# Altium PCB XY131B 65W-2C1A-V1.PcbDoc (part 2 of 2)
Units mm, origin at the board's own origin, x right, y up, seen from the top; angles counter-clockwise.
Board outline 28.2 x 43.45 mm, 4 copper layers (Top Layer, Signal Layer 1, Signal Layer 2, Bottom Layer), stack 0.778 mm thick; 73 components, 414 nets, 330 pads, 508 vias.
Unrouted connection lines stored in the file: 3.
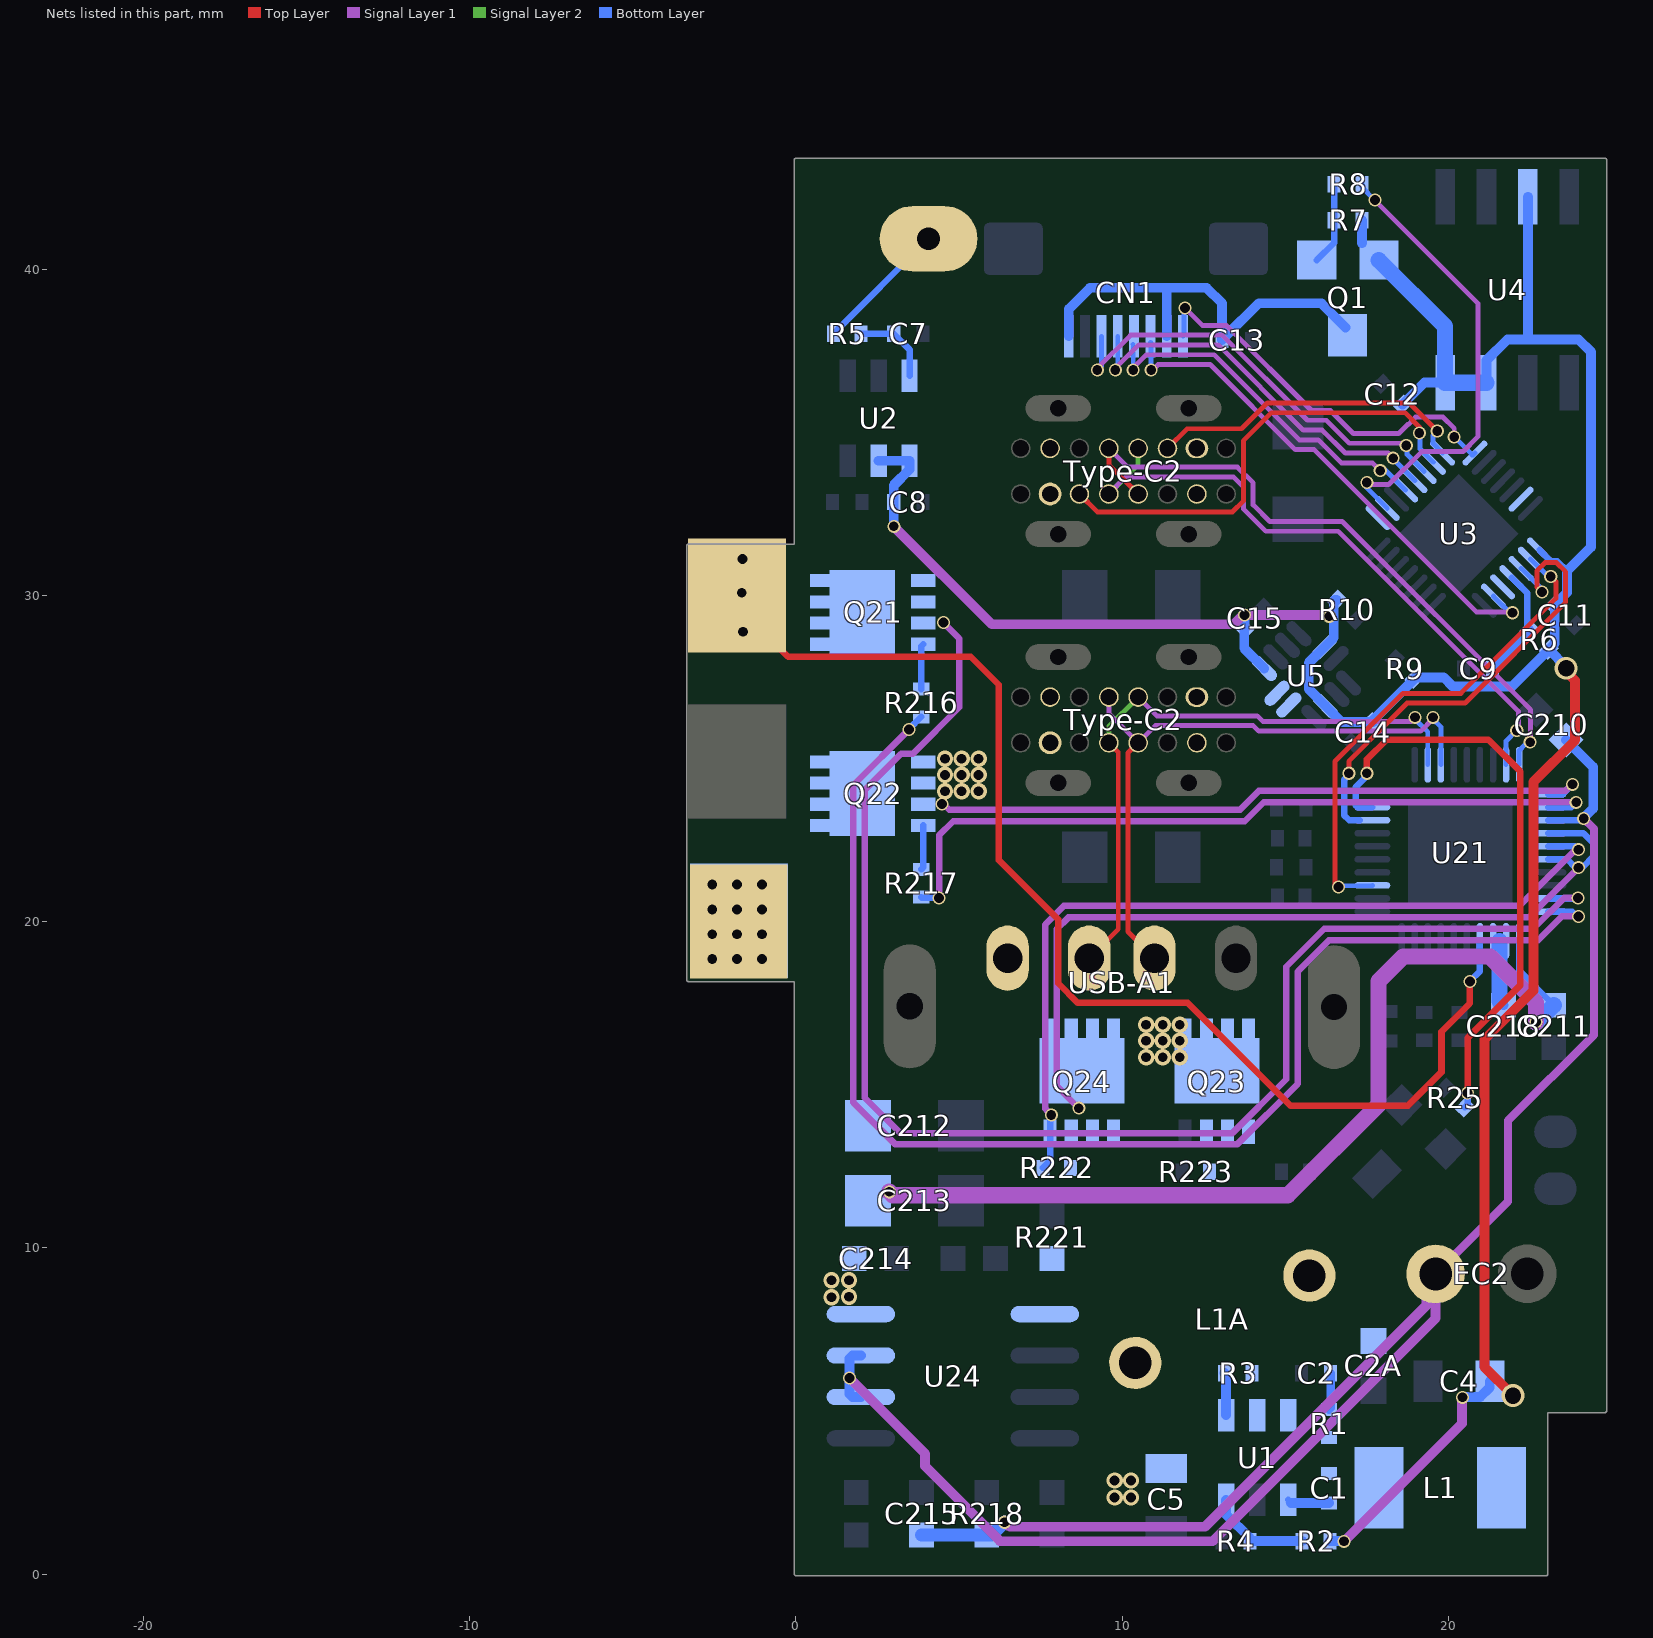
[diagram p4: the nets of this part, all layers, seen from the top]

## Via types
v1: diameter 0.5, hole 0.3, Top Layer to Bottom Layer, tented both sides, 434 vias
v2: diameter 0.4, hole 0.3, Top Layer to Bottom Layer, tented both sides, 72 vias
v3: diameter 0.7, hole 0.5, Top Layer to Bottom Layer, tented both sides, 2 vias

## Nets (pads, with @x,y where several pads share a name; then routed paths per layer and width w, separated by ;. In a path a pad name is that pad's centre, name@x,y a point inside that pad or via, vN(x,y) a via of type N, cw(c..) or ccw(c..) an arc to the next point about the centre after c; other vN are vias at no path point) (continued)
IC-DM_C1: Type-C2.A7DM1@10.492,34.51 Type-C2.B7DM1@9.592,33.11 U21.29 | length 19.7
  Signal Layer 1 w0.15: Type-C2.B7DM1@9.592,33.11 10.117,33.635 13.409,33.635 13.717,33.327 13.717,32.653 14.402,31.968 16.622,31.968 22.145,26.445 22.145,25.912 v2(22.096,25.864)
  Signal Layer 2 w0.15: Type-C2.B7DM1@9.592,33.11 10.492,34.01 Type-C2.A7DM1@10.492,34.51
  Bottom Layer w0.15: U21.29@21.77,24.81 21.77,25.537 v2(22.096,25.864)
IC-DM_C2: Type-C2.A7DM1@10.492,26.885 Type-C2.B7DM1@9.592,25.485 U21.23 USB-A1.2 | length 19.3
  Top Layer w0.15: USB-A1.2@8.992,18.881 9.88,19.77 9.88,25.197 Type-C2.B7DM1@9.592,25.485
  Signal Layer 1 w0.15: Type-C2.A7DM1@10.492,26.885 11.067,26.31 14.14,26.31 14.311,26.14 18.851,26.14 v2(18.976,26.265)
  Signal Layer 2 w0.15: Type-C2.B7DM1@9.592,25.485 9.592,25.985 Type-C2.A7DM1@10.492,26.885
  Bottom Layer w0.15: v2(18.976,26.265) 18.976,26.214 19.37,25.82 U21.23@19.37,24.81
IC-DP_C1: Type-C2.A6DP1@9.592,34.51 Type-C2.B6DP1@10.492,33.11 U21.30 | length 20.1
  Top Layer w0.15: Type-C2.A6DP1@9.592,34.51 9.592,34.01 Type-C2.B6DP1@10.492,33.11
  Signal Layer 1 w0.15: Type-C2.A6DP1@9.592,34.51 10.167,33.935 13.534,33.935 14.017,33.452 14.017,32.777 14.526,32.268 16.746,32.268 22.521,26.493 22.521,25.512 v2(22.51,25.501)
  Bottom Layer w0.15: U21.30@22.17,24.81 22.17,25.246 v2@22.377,25.453
IC-DP_C2: Type-C2.A6DP1@9.592,26.885 Type-C2.B6DP1@10.492,25.485 U21.24 USB-A1.3 | length 19.9
  Top Layer w0.15: Type-C2.B6DP1@10.492,25.485 10.18,25.173 10.18,19.693 USB-A1.3@10.992,18.881
  Signal Layer 1 w0.15: Type-C2.A6DP1@9.592,26.885 9.592,26.385 Type-C2.B6DP1@10.492,25.485 11.017,26.01 14.016,26.01 14.186,25.84 19.152,25.84 19.526,26.214 v2@19.526,26.248
  Bottom Layer w0.15: v2(19.526,26.265) 19.526,26.214 19.77,25.97 U21.24@19.77,24.81
"IIC SCL": U3.3 U21.18 | length 14.7
  Top Layer w0.15: v2(16.95,24.55) 16.95,24.916 18.734,26.7 20.51,26.7 23.597,29.787 23.597,30.727 23.316,31.007 22.964,31.007 22.715,30.758 22.715,30.259 v2(22.872,30.102)
  Bottom Layer w0.15: U3.3@22.229,30.829 22.824,30.235 22.824,30.15 v2(22.872,30.102)
  Bottom Layer w0.2: v2(16.95,24.55) 16.95,24.496 16.805,24.351 16.805,23.265 16.96,23.11 U21.18@17.28,23.11
"IIC SDA": U3.2 U21.13 | length 15.4
  Top Layer w0.15: v2(16.63,21.06) 16.525,21.165 16.525,24.915 18.61,27 20.386,27 23.297,29.911 23.297,30.426 v2(23.14,30.582)
  Bottom Layer w0.15: v2(16.63,21.06) 16.67,21.1 17.66,21.1 U21.13@17.67,21.11 ; U3.2@22.512,31.112 22.526,31.112 23.008,30.63 23.092,30.63 v2(23.14,30.582)
INT1: U5.5
INT2: U5.6
KEY: 
LCD_3V3: 
LCD_BL: 
LCD_CLK: CN1.6 U3.6 | length 16
  Signal Layer 1 w0.15: v2(10.89,36.91) 10.933,36.91 11.103,37.08 12.699,37.08 15.31,34.47 15.887,34.47 20.859,29.499 21.941,29.499 v2(21.97,29.47)
  Bottom Layer w0.15: CN1.6@10.87,37.76 10.89,37.74 v2(10.89,36.91) ; U3.6@21.381,29.981 21.892,29.47 v2(21.97,29.47)
LCD_CS: CN1.8 U3.25 | length 12.2
  Signal Layer 1 w0.15: v2(11.93,38.81) 12.46,38.28 13.196,38.28 15.806,35.669 16.384,35.669 17.088,34.965 18.474,34.965 18.748,35.239 18.771,35.239 18.997,35.465 19.836,35.465 20.18,35.121 v2(20.18,34.86)
  Bottom Layer w0.15: CN1.8@11.867,37.946 11.898,37.978 11.898,38.778 v2(11.93,38.81) ; v2(20.18,34.86) 20.729,34.311 20.761,34.311 U3.25@20.815,34.365
LCD_DC: CN1.4 U3.21 | length 12.3
  Signal Layer 1 w0.15: v2(9.79,36.91) 9.79,36.961 10.509,37.68 12.948,37.68 15.558,35.07 16.136,35.07 16.84,34.365 18.151,34.365 v2(18.309,34.207)
  Bottom Layer w0.15: v2(9.79,36.91) 9.867,36.987 CN1.4@9.867,37.946 ; v2(18.309,34.207) 18.309,34.184 U3.21@18.976,33.516
LCD_EN: 
LCD_EN2: R8.1 U3.18 | length 14.3
  Signal Layer 1 w0.15: v2(17.5,33.46) 17.559,33.401 18.171,33.401 19.18,34.41 20.45,34.41 20.904,34.864 20.904,38.959 17.75,42.113 v2(17.75,42.12)
  Bottom Layer w0.15: R8.1@17.35,42.61 17.35,42.52 v2(17.75,42.12) ; v2(17.5,33.46) 17.5,33.296 U3.18@18.128,32.668
LCD_MOSI: CN1.5 U3.20 | length 11.1
  Signal Layer 1 w0.15: v2(10.34,36.91) 10.34,36.978 10.45,37.088 10.45,37.09 10.74,37.38 12.824,37.38 15.434,34.77 16.011,34.77 16.716,34.066 17.673,34.066 v2(17.913,33.826)
  Bottom Layer w0.15: CN1.5@10.33,37.7 10.34,37.69 v2(10.34,36.91) ; v2(17.913,33.826) 18.09,33.826 18.682,33.234 U3.20@18.694,33.234
LCD_RES: CN1.3 U3.22 | length 13.5
  Signal Layer 1 w0.15: v2@9.24,36.92 9.24,36.961 10.259,37.98 13.072,37.98 15.682,35.37 16.26,35.37 16.964,34.665 18.645,34.665 v2(18.71,34.6)
  Bottom Layer w0.15: v2(9.24,36.91) 9.365,37.035 9.365,37.946 CN1.3@9.367,37.946 ; v2(18.71,34.6) 18.734,34.576 18.734,34.324 U3.22@19.259,33.799
LCD_RST: 
LCD_TE: U3.17
LDO3V3: 
LEDA: 
LGATE: 
LGATE1: 
LINK: 
MCU1_VCC: 
ME: 
MISO: 
MOSI: 
MP: 
MP1: 
N: 
NetBD1_1: 
NetBD1_2: 
NetBD1_3: 
NetBD2_2: 
NetC1_1: 
NetC1_2: 
NetC2_1: C1.1 L1.1 R1.2 U1.6
NetC2_2: C1.2 U1.1 | length 1.3
  Bottom Layer w0.2: U1.1@15.088,2.273 U1.1@15.181,2.181
  Bottom Layer w0.3: U1.1@15.181,2.181 C1.2@16.344,2.181
NetC3_1: 
NetC3_2: 
NetC4/NC_1: 
NetC4_1: 
NetC4_2: C2.2 R1.1 | length 1.1
  Bottom Layer w0.254: R1.1@16.344,5.041 16.394,5.091 C2.2@16.394,6.161
NetC5_1: 
NetC5_2: 
NetC6_1: 
NetC6_2: 
NetC7_1: 
NetC7_2: 
NetC8_1: 
NetC8_2: 
NetC9_1: 
NetC9_2: 
NetC10_1: 
NetC10_2: 
NetC11_1: 
NetC12_1: 
NetC13_1: 
NetC13_2: C7.2 R5.1 U2.3 | length 2.5
  Bottom Layer w0.2: R5.1@1.999,38.024 C7.2@2.999,38.024 3.485,37.538 U2.3@3.485,36.732
NetC14_1: 
NetC14_2: 
NetC18_2: 
NetC20_2: C218.2 U21.2 U21.3 | length 2
  Bottom Layer w0.3: C218.2@21.57,17.56 C218.2@21.69,17.44
  Bottom Layer w0.5: C218.2@21.57,17.56 21.57,19.41
NetC21_1: 
NetC21_2: 
NetC22_1: 
NetC22_2: 
NetC28_1: 
NetC31_1: 
NetC36_1: 
NetC36_2: 
NetC37_1: 
NetC41_1: 
NetC41_2: 
NetC48_1: 
NetC53_1: 
NetC53_2: 
NetC56_1: 
NetCC2_1: 
NetCN2_4: 
NetCN2_10: 
NetCX1_1: 
NetCX1_2: 
NetD1_2: 
NetD2_2: 
NetD3_1: 
NetD3_2: 
NetD18_2: 
NetD+_1: 
NetD-_1: 
NetF1_1: 
NetF1_2: 
NetIC1_23: 
NetIC1_27: 
NetIC2_3: 
NetIC2_5: 
NetIC2_6: 
NetJ1_A5: 
NetJ1_A6: 
NetJ1_A7: 
NetJ1_B5: 
NetJ2_A5: 
NetJ2_A6: 
NetJ2_A7: 
NetJ2_B5: 
NetJ3_2: 
NetJ3_3: 
NetK?_1: 
NetLF1_1: 
NetNTC1_1: 
NetQ1_4: 
NetQ1_G: 
NetQ2_1: 
NetQ2_2: 
NetQ2_3: 
NetQ3_B: 
NetQ3_C: 
NetQ3_G: 
NetQ4_G: 
NetQ5_G: 
NetQ6_D: 
NetQ6_G: Q1.G R7.1 R8.2 | length 2.6
  Bottom Layer w0.2: Q1.G@15.965,40.28 16.5,40.815 R7.1@16.5,41.5 R8.2@16.5,42.61
NetQ7_S: 
NetQ8_1: 
NetQ8_3: 
NetQ8_D: 
NetQ8_G: 
NetR1_1: 
NetR1_2: 
NetR2_2: 
NetR3_2: 
NetR5_2: 
NetR6_1: 
NetR7_1: R2.1 R4.2 U1.3 | length 3.2
  Bottom Layer w0.3: U1.3@13.188,2.273 13.188,1.832 13.914,1.106 R4.2@13.914,1.011 R2.1@15.519,1.011
NetR8_1: R3.1 U1.4 | length 1.3
  Bottom Layer w0.3: R3.1@13.134,6.161 13.188,6.107 U1.4@13.188,4.873
NetR9_2: 
NetR10_1: 
NetR10_2: 
NetR11_1: 
NetR11_2: pad.18 R5.2 | length 4.1
  Bottom Layer w0.2: R5.2@1.149,38.024 4.06,40.935 pad.18@4.067,40.935
NetR12_2: 
NetR13_1: 
NetR13_2: 
NetR14_2: 
NetR16_2: 
NetR18_2: 
NetR20_1: 
NetR21_2: 
NetR22_1: 
NetR22_2: 
NetR23_1: 
NetR24_1: 
NetR24_2: 
NetR25_1: 
NetR25_2: 
NetR26_2: 
NetR31_1: 
NetR32_1: 
NetR46_1: 
NetR46_2: 
NetR47_1: 
NetR47_2: 
NetR54_1: 
NetR55_2: 
NetRT1_2: 
NetTYPE_C1_A1: 
NetTYPE_C1_A4: 
NetTYPE_C1_CC1: 
NetTYPE_C1_DM1: 
NetTYPE_C1_DP1: 
NetTYPE_C2_A4: 
NetTYPE_C2_CC1: 
NetTYPE_C2_DM1: 
NetTYPE_C2_DP1: 
NetUSBA1_2: 
NetUSBA1_3: 
NetUSBA1_4: 
NetXC6_1: 
NetXC7_1: 
NetXC7_2: 
NetXC8_1: 
NetXC9_1: 
NetXC9_2: 
NetXC12_1: 
NetXC12_2: pad.17 U21.4 | length 37.5
  Top Layer w0.2: pad.17@-1.809,30.004 -1.809,29.689 -0.24,28.12 5.36,28.12 6.22,27.26 6.22,21.89 8.04,20.07 8.04,18.11 8.64,17.51 12.01,17.51 15.17,14.35 18.75,14.35 19.79,15.39 19.79,16.626 20.66,17.496 v2(20.66,18.17)
  Bottom Layer w0.2: v2(20.66,18.17) 20.97,18.48 U21.4@20.97,19.41
  other v1: -1.62,28.89 -1.66,30.08 -1.64,31.12
NetXC13_1: 
NetXC14_1: 
NetXC15_1: 
NetXC16_1: 
NetXC17_1: 
NetXC21_2: 
NetXC25_1: 
NetXD?_1: 
NetXQ1_1: 
NetXQ1_2: 
NetXQ2_1: 
NetXQ2_2: 
NetXQ3_1: 
NetXQ6_D: 
NetXQ6_G: 
NetXR1_1: 
NetXR2_1: 
NetXR8_2: 
NetXR9_2: 
NetXR10_2: 
NetXR14_2: 
NetXR15_1: 
NetXR18_2: 
NetXR19_2: 
NetXR23_1: 
NetXR24_1: 
NetXU2_6: 
NewNet01: 
NewNet03: 
NewNet04: 
NewNet05: 
NRST: 
NTC: 
NTC1: 
NTC2: 
ntcc: 
OLED_CS: 
OLED_D/CX: 
OLED_RST: 
OLED_SCL: 
OLED_SDA: 
OPTO: 
OPTO1: 
PA3: 
PB7: U3.30
PB8: 
PDER: 
PF3: U3.5
PF4: 
PGND: 
PLUGA: 
RA: 
RS: 
RST: C9.1 R6.1 U3.4 | length 3.5
  Bottom Layer w0.2: U3.4@21.946,30.546 22.423,30.07 22.423,28.997 R6.1@22.479,28.941
  Bottom Layer w0.3: C9.1@21.36,27.76 22.479,28.879 R6.1@22.479,28.941
RX: 
RX1: 
RX2: 
SCK: 
SCL: 
"SCL 1": 
SDA: 
"SDA 1": 
SEN1_P: 
SEN2_P: 
SEN21_P: 
SEN22_P: 
SGND: 
SRCG_A: Q24.G R222.1 U21.35 | length 25.9
  Signal Layer 1 w0.2: 7.64,19.04 7.64,19.91 8.211,20.481 22.175,20.481 23.899,22.206 v2(23.986,22.206) ; 7.64,19.04 cw(c6.492,18.981) 7.642,18.981 7.642,18.781 cw(c6.492,18.781) 7.64,18.722 7.64,14.266 7.699,14.208 v2(7.83,14.076)
  Bottom Layer w0.2: R222.1@7.57,12.45 7.79,12.67 Q24.G@7.79,13.56 7.79,14.036 v2(7.83,14.076) ; U21.35@23.07,22.31 23.882,22.31 v2(23.986,22.206)
SRCG_C1: Q21.G R216.1 R216.2 U21.40 | length 42.5
  Signal Layer 1 w0.2: v2(3.47,25.89) 1.76,24.18 1.76,14.46 3.05,13.17 13.525,13.17 15.38,15.025 15.38,18.47 16.341,19.431 22.751,19.431 23.48,20.16 v2(23.986,20.16)
  Bottom Layer w0.2: v2(3.47,25.89) 3.47,25.91 R216.2@3.84,26.28 ; R216.1@3.84,27.13 3.84,28.442 Q21.G@3.903,28.505 ; U21.40@23.07,20.31 23.804,20.31
SRCG_C2: Q22.G R217.1 R217.2 U21.32 | length 24.7
  Signal Layer 1 w0.2: v2(4.39,20.73) 4.39,22.65 4.82,23.08 13.76,23.08 14.34,23.66 v2(23.92,23.66)
  Bottom Layer w0.2: R217.2@3.84,20.75 3.86,20.73 v2(4.39,20.73) ; R217.1@3.84,21.6 3.903,21.663 Q22.G@3.903,22.95 ; U21.32@23.07,23.51 23.77,23.51 v2(23.92,23.66)
SW: L1A.1 R221.1 U24.5SW
SW1: 
SW2: 
SWCLK: Type-C2.A8SUB1@11.392,34.51 U3.24 | length 10.1
  Top Layer w0.15: Type-C2.A8SUB1@11.392,34.51 11.992,35.11 13.66,35.11 14.45,35.9 18.8,35.9 v2(19.66,35.04) v2@19.66,34.972
  Bottom Layer w0.15: v2(19.66,35.04) 19.53,34.91 19.53,34.66 U3.24@19.825,34.365
SWD: Type-C2.B8SUB2@8.692,33.11 U3.23 | length 14.4
  Top Layer w0.15: Type-C2.B8SUB2@8.692,33.11 9.242,32.56 13.384,32.56 13.717,32.893 13.717,34.743 14.574,35.6 18.676,35.6 19.11,35.166 v2(19.11,34.977)
  Bottom Layer w0.15: v2(19.11,34.977) 19.135,34.952 19.135,34.489 U3.23@19.542,34.082
SWDIO: 
SWIO: 
TA: 
TX: 
Ut_RXD2: 
Ut_TXD2: 
VBUS1: 
VBUS1-1: 
VBUS2: 
VBUS3: 
VBUS3-1: 
VBUS4: 
VBUS4-1: 
VBUS_A3: C2A.2 C210.2 C215.1 EC2.1 L1A.2 Q23.S Q24.S R218.1 R222.2 R223.2 U21.33 U24.2CSP U24.3CSN | length 66
  Signal Layer 1 w0.25: EC2.1@19.61,9.2 21.83,11.42 21.83,13.9 24.461,16.531 24.461,22.848 v2(24.149,23.16)
  Signal Layer 1 w0.3: v2(1.64,6.01) 3.96,3.69 3.96,3.31 6.26,1.01 12.78,1.01 19.61,7.84 EC2.1@19.61,9.2 19.323,8.913 19.323,8.233 12.542,1.452 6.555,1.452 6.417,1.59 v2(6.39,1.59)
  Bottom Layer w0.2: U21.33@23.07,23.11 24.045,23.11 24.095,23.16 v2(24.149,23.16)
  Bottom Layer w0.3: U24.2CSP@1.992,5.43 1.732,5.43 1.64,5.522 1.64,6.608 1.732,6.7 U24.3CSN@1.992,6.7 ; C210.2@23.61,25.57 24.44,24.74 24.44,23.473 24.149,23.182 v2(24.149,23.16)
  Bottom Layer w0.4: C215.1@3.85,1.2 R218.1@5.85,1.2 6,1.2 v2(6.39,1.59)
VBUS_C1: C5.1 C211.1 C212.1 C213.1 C214.2 pad.16@-1.745,20.027 pad.16@-1.752,20.002 Q21.D Q22.D R3.2 U1.5 U21.1 U24.4Vin | length 29.5
  Signal Layer 1 w0.5: v2(2.862,11.719) 2.971,11.61 15.08,11.61 17.86,14.39 17.86,18.17 18.621,18.931 21.279,18.931 22.69,17.52 v2(22.69,16.921)
  Bottom Layer w0.2: U21.1@22.17,19.41 22.17,18.5 C211.1@23.23,17.44
  Bottom Layer w0.5: v2(22.69,16.921) 22.711,16.921 C211.1@23.23,17.44
  other v1: 9.77,2.35 10.27,2.35 9.77,2.87 10.27,2.87 1.09,8.49 1.63,8.5 1.09,9.01 1.63,9.01 -2.566,18.852 -1.804,18.852 -1.042,18.852 -2.566,19.614 -1.804,19.614 -1.042,19.614 -2.566,20.376 -1.804,20.376 -1.042,20.376 -2.566,21.138 -1.804,21.138 -1.042,21.138
VBUSA: 
VBUSA1: 
VBUSC: 
VBUSC1: 
VBUSC2: 
VBUSC_A: Q24.D U21.34 U21.36 USB-A1.1 | length 26.2
  Signal Layer 1 w0.2: v2(8.673,14.283) 7.99,14.967 7.99,18.59 7.992,18.592 7.992,19.767 8.356,20.131 14.96,20.131 22.461,20.131 v2(23.986,21.656)
  Bottom Layer w0.2: U21.36@23.07,21.91 23.645,21.91 23.899,21.656 v2(23.986,21.656) 24.104,21.656 24.46,22.012 24.46,22.39 24.14,22.71 U21.34@23.07,22.71 ; v2@23.97,21.72 23.996,21.694 v2@24.06,21.694
VBUSC_C1: Q21.S Type-C2.A4@7.792,34.51 Type-C2.A9@12.292,34.51 Type-C2.B4@12.292,33.11 Type-C2.B9@7.792,33.11 U21.39 | length 44.4
  Signal Layer 1 w0.2: v2(4.52,29.17) 5.01,28.68 5.01,26.57 3.588,25.148 3.222,25.148 2.11,24.035 2.11,14.605 3.195,13.52 13.38,13.52 15.03,15.17 15.03,18.615 16.196,19.781 22.606,19.781 23.551,20.726 v2(23.976,20.726)
  Bottom Layer w0.2: U21.39@23.07,20.71 23.96,20.71 v2(23.976,20.726)
VBUSC_C2: Q22.S Q23.D Type-C2.A4@7.792,26.885 Type-C2.A9@12.292,26.885 Type-C2.B4@12.292,25.485 Type-C2.B9@7.792,25.485 U21.31 | length 20.6
  Signal Layer 1 w0.2: v2(4.48,23.61) 4.517,23.61 4.697,23.43 13.615,23.43 14.195,24.01 23.593,24.01 23.793,24.21 v2(23.81,24.21)
  Bottom Layer w0.2: U21.31@23.07,23.91 23.51,23.91 v2(23.81,24.21)
  other v1: 10.735,15.847 11.245,15.847 11.765,15.847 10.735,16.347 11.245,16.347 11.765,16.347 10.735,16.841 11.245,16.841 11.765,16.841 4.57,24 5.08,24 5.6,24 4.57,24.5 5.08,24.5 5.6,24.5 4.57,24.994 5.08,24.994 5.6,24.994
VC2-ON: R25.2 U21.19 | length 18.5
  Top Layer w0.2: v2(17.5,24.55) 17.5,24.971 18.109,25.58 21.23,25.58 22.21,24.6 22.21,18.056 20.59,16.436 v2(20.59,14.75)
  Bottom Layer w0.2: v2(17.5,24.55) 17.5,24.464 17.155,24.119 17.155,23.575 17.22,23.51 U21.19@17.67,23.51 ; R25.2@20.501,14.304 20.59,14.393 v2(20.59,14.75)
VCC: 
VCC1: 
VCC2: 
VDD: C13.2 CN1.1 CN1.7 Q1.D | length 13.2
  Bottom Layer w0.3: CN1.1@8.367,37.946 8.367,38.787 9.01,39.43 11.41,39.43 ; CN1.7@11.367,37.946 11.367,39.387 11.41,39.43 ; Q1.D@16.85,38.21 16.11,38.95 16.11,38.96 14.19,38.96 13.16,37.93 13.11,37.93 13.06,37.88 C13.2@13.06,37.83 13.06,38.96 12.59,39.43 11.41,39.43
VDD1: 
VDRV: 
VDRV1: 
VIN: 
VIN_3V: C4.2 C8.1 C11.1 C12.2 C14.2 C15.1 L1.2 Q1.S R2.2 R6.2 R7.2 R9.2 R10.1 U2.4 U2.5 U3.1 U4.3 U4.7 U4.8 U5.3 U5.7 U5.11 | length 91.9
  Top Layer w0.3: v3(21.98,5.47) 21.11,6.34 21.11,16.39 22.61,17.89 22.61,24.29 23.88,25.56 23.88,27.394 23.61,27.664 v3(23.61,27.77)
  Signal Layer 1 w0.3: v2(3,32.12) 6,29.12 13.43,29.12 13.71,29.4 v2(13.75,29.4) 16.31,29.4 v2(16.35,29.36) ; v2(16.805,1.004) 20.421,4.62 20.421,5.411 v2(20.43,5.42)
  Bottom Layer w0.2: U3.1@22.795,31.395 23.14,31.05 23.34,31.05 23.64,30.75
  Bottom Layer w0.3: U2.5@2.535,34.132 U2.4@3.485,34.132 3.485,33.865 2.999,33.379 C8.1@2.999,32.864 v2(3,32.12) v2(3,32.12) ; C15.1@13.742,28.982 13.742,28.381 U5.7@14.359,27.764 ; v2(13.75,29.4) 13.75,28.97 C15.1@13.76,28.96 ; R2.2@16.369,1.011 16.798,1.011 v2(16.805,1.004) ; R10.1@16.519,29.861 R10.1@16.579,29.861 16.49,29.772 16.49,28.707 U5.11@16.204,28.422 15.72,27.937 15.72,27.128 16.231,26.617 U5.3@16.231,26.61 16.723,26.118 C14.2@17.698,26.118 17.698,26.178 18.894,27.374 18.894,27.384 18.995,27.485 19.86,27.485 20.136,27.21 21.95,27.21 R6.2@23.08,28.34 ; Q1.S@17.35,40.8 R7.2@17.35,41.5 ; C12.2@18.598,35.852 19.271,36.525 U4.8@19.9,36.525 ; v2(20.43,5.42) 20.435,5.425 20.976,5.425 21.27,5.72 C4.2@21.27,5.91 ; U4.7@21.17,36.525 21.17,37.21 21.81,37.85 22.43,37.85 ; U4.3@22.44,42.225 22.44,37.86 22.43,37.85 ; v3@23.502,27.77 v3(23.61,27.77) 23.61,27.81 R6.2@23.08,28.34 ; 22.43,37.85 23.99,37.85 24.37,37.47 24.37,31.48 23.64,30.75 23.64,30.093 C11.1@23.264,29.716 23.264,28.524 R6.2@23.08,28.34
  Bottom Layer w0.5: Q1.S@17.87,40.28 19.9,38.25 U4.8@19.9,36.525 U4.7@21.17,36.525
VMCU: 
VOUT1: 
VOUT1G: 
VOUT2: 
VOUT2G: 
VOUT3G: 
VOUTA: 
WP: 
pads on no net: Type-C2.A8SUB1@11.392,26.885 Type-C2.B8SUB2@8.692,25.485 U3.8 U3.9 U3.32 U5.10 U21.5 U21.6 U21.20 U21.21 U21.37 U21.38 U24.6SW

## Polygon pours and split planes (outlines as drawn)
FLASH_MOSI on Bottom Layer "FLASH_MOSI_L04_P033" (solid, remove dead copper, pour order 33): 22.99,37.9 22.99,34.54 22.85,34.4 24.12,34.4 24.12,37.87 24.08,37.91
FLASH_CLK on Bottom Layer "FLASH_CLK_L04_P032" (solid, remove dead copper, pour order 32): 23.03,37.91 23.03,35.05 21.37,33.39 20.79,33.39 21.12,33.72 21.12,38
"IIC SDA" on Bottom Layer "IIC_SDA_L04_P030" (solid, remove dead copper, pour order 30): 15.7,21.99 15.7,20.25 15.33,19.88 15.61,19.6 18.13,19.6 18.13,21.4 18.29,21.56
NetXC12_2 on Bottom Layer "NETXC12_2_L04_P029" (solid, remove dead copper, pour order 29): 19.74,20.48 19.79,20.43 19.79,16.61 21.65,16.61 21.67,16.59 21.67,19.78
VBUS_C1 on Bottom Layer "VBUS_C1_L04_P028" (solid, remove dead copper, pour order 28): 21.58,20.28 21.58,16.97 22.1,16.45 23.67,16.45 23.67,20.03 23.72,20.08
CSP_A on Bottom Layer "CSP_A_L04_P011" (solid, remove dead copper, pour order 11): 11.02,22.82 10.92,22.72 10.92,18.41 11.44,17.89 15.48,17.89 15.56,17.81 15.56,15.97 16.13,15.4 16.86,15.4 17.3,15.84 17.3,18.88 15.94,20.24 13.64,20.24 12.43,21.45 12.43,22.82
GND on Bottom Layer "GND_L04_P026" (solid, remove dead copper, pour order 26): -7.88,49.89 -7.88,-0.37 -5.38,-2.87 -5.3,-2.79 31.36,-2.79 31.36,44.57 29.25,46.68
VBUSC_C2 on Bottom Layer "VBUSC_C2_L04_P019" (solid, remove dead copper, pour order 19): 10.55,17.11 14.08,17.11 14.24,16.95 14.24,14 14.17,13.93 10.22,13.93 10.11,14.04 10.11,17.03 10.16,17.08 10.58,17.08
CSP_C1 on Bottom Layer "CSP_C1_L04_P017" (solid, remove dead copper, pour order 17): 6.47,36.43 6.47,31.77 6.83,31.41 16.11,31.41 16.28,31.58 16.28,33.04 16.22,33.1 14.36,33.1 14.19,33.27 14.19,35.96 13.81,36.34 6.87,36.34 6.46,35.93
CSP_C2 on Bottom Layer "CSP_C2_L04_P016" (solid, remove dead copper, pour order 16): 9.57,31.06 9.57,29.26 9.89,28.94 12.58,28.94 13.74,27.78 13.74,24.52 12.86,23.64 6.99,23.64 3.99,26.64 3.99,28.64 5.957,30.607
VBUSC_C1 on Bottom Layer "VBUSC_C1_L04_P013" (solid, remove dead copper, pour order 13): 3.52,32.67 6.17,35.32 12.4,35.32 12.69,35.03 12.69,31.06 12.57,30.94 8.12,30.94 6.14,28.96 3.52,28.96
VBUSC_C2 on Bottom Layer "VBUSC_C2_L04_P012" (solid, remove dead copper, pour order 12): 3.49,27.84 12.29,27.84 12.77,27.36 12.77,24.94 12.75,24.94 11.2,23.39 6.1,23.39 3.49,23.39
VBUSC_A on Bottom Layer "VBUSC_A_L04_P010" (solid, remove dead copper, pour order 10): 6.08,20 5.57,19.49 5.57,16.27 7.82,14.02 10.14,14.02 10.14,16.94 10.04,17.04 7.93,17.04 7.49,17.48 7.49,19.32 6.81,20 6.68,20
VBUS_A3 on Bottom Layer "VBUS_A3_L04_P009" (solid, remove dead copper, pour order 9): 19.57,9.24 18.15,7.82 15.87,7.82 14.92,8.77 14.92,9.52 15.35,9.95 18.77,9.95 19.51,9.21
VBUS_A3 on Bottom Layer "VBUS_A3_L04_P008" (solid, remove dead copper, pour order 8): 8.22,13.92 18.1,13.92 20.64,11.38 20.64,8.64 18.69,6.69 17.31,6.69 17.23,6.77 17.23,7.54 17.33,7.64 18.26,7.64 19.2,8.58 19.2,9.87 18.83,10.24 10.13,10.24 8.18,12.19 8.18,13.95 8.22,13.99
VIN_3V on Bottom Layer "VIN_3V_L04_P006" (solid, remove dead copper, pour order 6): 20.84,6.54 20.84,1.37 20.9,1.31 22.33,1.31 22.4,1.38 22.4,5.96 21.76,6.6 20.89,6.6 20.83,6.54
NetC2_1 on Bottom Layer "NETC2_1_L04_P005" (solid, remove dead copper, pour order 5): 14.83,1.61 15.05,1.39 18.65,1.39 18.65,4.38 18.59,4.44 16.04,4.44 15.56,4.92 15.56,5.34 15.51,5.39 14.86,5.39 14.83,5.36
VBUS_C1 on Bottom Layer "VBUS_C1_L04_P004" (solid, remove dead copper, pour order 4): 9.49,2.23 9.49,3.04 10.65,4.2 13.6,4.2 13.77,4.37 13.77,6.38 13.8,6.41 14.23,6.41 14.42,6.22 14.42,3.9 14.09,3.57 12.09,3.57 11.99,3.47 11.99,2.77 11.98,2.76 11.08,2.76 10.39,2.07 9.65,2.07
SW on Bottom Layer "SW_L04_P001" (solid, remove dead copper, pour order 1): 7.46,10.08 7.46,9.01 6.55,8.1 6.55,7.49 6.71,7.33 8.88,7.33 9.37,6.84 9.37,6.23 9.96,5.64 10.82,5.64 11.27,6.09 11.27,7.11 8.3,10.08 8.23,10.08
VBUS_C1 on Bottom Layer "VBUS_C1_L04_P000" (solid, remove dead copper, pour order 0): 3.17,7.79 3.06,7.68 0.64,7.68 0.13,8.19 0.13,16.69 -1.09,17.91 -3.54,17.91 -3.54,22.45 -3.71,22.62 0.24,22.62 0.41,22.79 0.41,30.69 0.56,30.84 0.58,30.82 3.17,30.82
GND on Signal Layer 1 "GND_L02_P024" (solid, remove dead copper, pour order 24): -2.1,51.04 -5.85,47.29 -5.85,-2.97 -3.58,-5.24 -2.45,-4.11 31.79,-4.11 31.79,48.08 32.31,48.6
CSP_C1 on Signal Layer 1 "CSP_C1_L02_P022" (solid, remove dead copper, pour order 22): 7,36.36 6.51,35.87 6.51,32.05 7.08,31.48 12.95,31.48 13.58,32.11 13.58,35.49 12.71,36.36 12.56,36.36
CSP_C2 on Signal Layer 1 "CSP_C2_L02_P021" (solid, remove dead copper, pour order 21): 12.72,28.6 7.027,28.6 6.53,28.103 6.53,24.57 7.21,23.89 13.06,23.89 13.59,24.42 13.59,27.79 12.8,28.58
VBUS_C1 on Signal Layer 1 "VBUS_C1_L02_P014" (solid, remove dead copper, pour order 14): 1.78,9.34 0.96,9.34 0.8,9.18 0.8,6.66 6.26,1.2 10.26,1.2 10.59,1.53 10.59,3.12 10.44,3.27 6.71,3.27 1.91,8.07 1.91,9.22 1.78,9.35
VC2-ON on Top Layer "VC2-ON_L01_P031" (solid, remove dead copper, pour order 31): 17.12,26.38 17.22,26.28 17.22,24.22 21.97,24.22 22.34,24.59 22.14,24.79 22.14,27.03
GND on Top Layer "GND_L01_P023" (solid, remove dead copper, pour order 23): -4.55,53.62 -2.79,51.86 -2.79,-2.24 29,-2.24 32.62,1.38 32.62,51.97
VBUSC_C2 on Top Layer "VBUSC_C2_L01_P020" (solid, remove dead copper, pour order 20): 4.27,17.64 6.3,15.61 12.02,15.61 12.11,15.7 12.11,17.16 12,17.27 8.82,17.27 8.5,17.59 8.5,19.9 6.41,21.99 6.41,25.13 6.28,25.26 4.44,25.26 4.27,25.09
CSP_C1 on Top Layer "CSP_C1_L01_P018" (solid, remove dead copper, pour order 18): 12.98,36.35 6.94,36.35 6.48,35.89 6.48,31.9 6.97,31.41 12.92,31.41 13.56,32.05 13.56,35.77
CSP_C2 on Top Layer "CSP_C2_L01_P015" (solid, remove dead copper, pour order 15): 12.84,28.54 6.57,28.54 6.44,28.41 6.44,24.48 7.08,23.84 13.32,23.84 13.53,24.05 13.53,27.85
GND on Signal Layer 2 "GND_L03_P025" (solid, remove dead copper, pour order 25): -6.94,50.36 -5.92,49.34 -5.92,-1.46 32.53,-1.46 33.94,-2.87 35.42,-1.39 35.42,50.43

## Keep-outs
Keep-Out Layer:
  lines w0.1: -21.781,32.406 -21.777,32.402 ; -3.303,32 -3.3,18.09 ; -3.303,32.007 -0.335,32.007 ccw(c-0.036,32.037) -0.003,32.336 ; -3.295,18.084 -0.328,18.084 ; -0.328,18.087 cw(c-0.03,18.053) 0.001,17.755 ; 0,17.754 0,0 ; 0,31.851 0,43.35 ; 0.001,43.352 24.801,43.352 24.801,5.001 23.003,5.001 23.003,0.007 22.995,0 0,0 ; 0,0 0,0

## Other copper
Top Layer:
  rectangle net VBUS_C1: -3.39,18.22 0.25,22.3
  pour cut-out: 1.15,43.38 1.15,38.95 1.13,38.93 1.13,38.55 1.17,38.51 6.74,38.51 6.9,38.67 6.9,43.36 6.92,43.38 1.18,43.38 1.13,43.33
  pour cut-out: 15.68,26.97 13.23,29.42 10.89,29.42 10.74,29.57 10.74,29.69 10.89,29.84 10.89,30.19 10.77,30.31 10.4,30.31 10.06,29.97 10.06,29.3 10.57,28.79 12.98,28.79 12.98,28.76 14.95,26.79 14.95,23.62 14.69,23.36 14.73,23.32 14.73,22.85 14.87,22.71 15.47,22.71 15.68,22.92 15.68,23.2
  pour cut-out: 15.25,34.35 15.82,34.35 17.41,32.76 17.41,28.51 16.26,27.36 16.26,21.13 18.33,19.06 18.33,16.37 18.39,16.31 18.65,16.31 18.88,16.08 18.88,15.68 18.69,15.49 18.64,15.54 18.06,15.54 18.06,15.58 17.71,15.93 17.71,18.87 15.68,20.9 15.68,27.66 16.81,28.79 16.78,28.82 16.78,32.54 15.79,33.53 15.38,33.53 15.02,33.89 15.02,34.12
Signal Layer 1:
  pour cut-out: 18.163,15.966 ccw(c18.52,15.966) 18.52,15.609 ccw(c18.52,15.966) 18.877,15.966 ccw(c18.52,15.966) 18.52,16.323 ccw(c18.52,15.966)
  pour cut-out: 14.723,23.146 ccw(c15.08,23.146) 15.08,22.789 ccw(c15.08,23.146) 15.437,23.146 ccw(c15.08,23.146) 15.08,23.503 ccw(c15.08,23.146)
  pour cut-out: 15.023,34.016 ccw(c15.38,34.016) 15.38,33.659 ccw(c15.38,34.016) 15.737,34.016 ccw(c15.38,34.016) 15.38,34.373 ccw(c15.38,34.016)
  pour cut-out: 10.203,29.97 ccw(c10.56,29.97) 10.56,29.613 ccw(c10.56,29.97) 10.917,29.97 ccw(c10.56,29.97) 10.56,30.327 ccw(c10.56,29.97)
  pour cut-out: 1.4,43.09 1.4,38.9 1.44,38.86 6.55,38.86 6.61,38.8 6.61,43.31 6.68,43.38
Signal Layer 2:
  pour cut-out: 15.021,34.03 ccw(c15.378,34.03) 15.378,33.673 ccw(c15.378,34.03) 15.735,34.03 ccw(c15.378,34.03) 15.378,34.387 ccw(c15.378,34.03)
  pour cut-out: 10.201,29.95 ccw(c10.558,29.95) 10.558,29.593 ccw(c10.558,29.95) 10.915,29.95 ccw(c10.558,29.95) 10.558,30.307 ccw(c10.558,29.95)
  pour cut-out: 14.721,23.15 ccw(c15.078,23.15) 15.078,22.793 ccw(c15.078,23.15) 15.435,23.15 ccw(c15.078,23.15) 15.078,23.507 ccw(c15.078,23.15)
  pour cut-out: 18.16,15.967 ccw(c18.517,15.967) 18.517,15.61 ccw(c18.517,15.967) 18.874,15.967 ccw(c18.517,15.967) 18.517,16.323 ccw(c18.517,15.967)
  pour cut-out: 1.38,43.16 1.38,38.84 1.4,38.82 6.55,38.82 6.58,38.79 6.58,43.35 1.8,43.35 1.69,43.46
Bottom Layer:
  rectangle net GPIO1: 22.28,12.7 24.59,14.54
  pour cut-out: 5.82,43.36 5.82,39.31 5.05,38.54 3.62,38.54 3.59,38.51 3.59,37.84 4.04,37.39 4.04,35.91 4.03,35.9 2.92,35.9 2.89,35.93 2.89,37.29 0.69,37.29 0.58,37.4 0.58,43.54 0.73,43.69 5.82,43.69 5.83,43.68
  pour cut-out: 15,34.51 15,33.03 15.01,33.02 15.75,33.02 15.76,33.01 15.76,34.49 15.01,34.49
  pour cut-out: 18.09,21.06 17.01,21.06 16.61,20.66 16.61,19.96 17.43,19.14 17.43,16.71 17.73,16.41 17.73,16.02 17.81,15.94 18.07,15.94 18.38,15.63 18.72,15.63 18.91,15.82 18.91,16.35 18.08,17.18 18.08,17.19 18.04,17.23 18.04,19.41 18.03,19.41 17.39,20.05 17.39,20.27 17.41,20.29 18.36,20.29 18.48,20.41 18.48,20.88 18.23,21.13 17.95,21.13
  pour cut-out: 9.78,22.3 9.89,22.41 9.89,23.05 10.56,23.72 12.87,23.72 13.34,23.25 13.34,21.91 13.62,21.63 14.37,21.63 13.94,22.06 13.94,23.97 14.56,24.59 16.29,24.59 16.82,24.06 16.82,23.25 17.02,23.05 17.07,23.1 18.42,23.1 18.42,22 16.21,22 15.65,22.56 15.65,21.62 14.9,20.87 14.67,20.87 14.47,21.07 13.34,21.07 12.77,21.64 12.77,22.96 12.57,23.16 10.8,23.16 10.51,22.87 10.51,22.19 9.97,21.65 9.56,21.65 9.56,22.3
  pour cut-out: 9.58,30.35 11.02,30.35 11.03,30.34 11.03,29.59 11.05,29.57 9.57,29.57 9.55,29.55 9.55,30.32 9.59,30.36

## Silkscreen, mask and mechanical layers (free items; w line width, h text height)
Top Overlay:
  lines w0.1: 0,0.001 23,0.001 23,5.001 24.8,5.001 24.8,43.351 0.012,43.351 ; 0,0.012 0,43.351 ; 3.4,15.041 3.4,19.841 ; 3.7,15.041 3.7,19.841 ; 3.8,13.741 3.8,14.541 16.2,14.541 16.2,13.741 11.6,13.741 11.6,14.541 ; 3.9,14.841 16.1,14.841 ; 3.9,20.041 16.1,20.041 ; 4.6,18.441 15.4,18.441 ; 4.6,19.241 15.4,19.241 ; 5.5,25.591 5.5,26.751 ; 5.5,33.251 5.5,34.411 ; 5.8,25.591 5.8,26.751 ; 5.8,33.251 5.8,34.411 ; 5.82,25.591 5.82,26.914 ; 5.82,33.251 5.82,34.574 ; 6.35,27.74 6.35,27.751 13.65,27.751 13.65,27.74 ; 6.35,35.4 6.35,35.411 13.65,35.411 13.65,35.4 ; 6.5,24.591 13.5,24.591 ; 6.5,24.891 13.5,24.891 ; 6.5,24.911 13.5,24.911 ; 6.5,27.451 13.5,27.451 ; 6.5,32.251 13.5,32.251 ; 6.5,32.551 13.5,32.551 ; 6.5,32.571 13.5,32.571 ; 6.5,35.111 13.5,35.111 ; 8.356,24.911 8.376,24.891 ; 8.356,32.571 8.376,32.551 ; 8.4,13.741 8.4,14.541 ; 8.4,20.341 8.4,21.141 3.8,21.141 3.8,20.341 16.2,20.341 16.2,21.141 11.6,21.141 11.6,20.341 ; 8.78,24.911 8.785,24.906 ; 8.78,32.571 8.785,32.566 ; 8.8,24.891 8.8,24.896 ; 8.8,32.551 8.8,32.556 ; 10.29,27.451 10.29,27.751 ; 10.29,35.111 10.29,35.411 ; 10.31,27.451 10.31,27.751 ; 10.31,35.111 10.31,35.411 ; 11.2,24.891 11.2,24.896 ; 11.2,32.551 11.2,32.556 ; 11.215,24.906 11.22,24.911 ; 11.215,32.566 11.22,32.571 ; 11.624,24.891 11.644,24.911 ; 11.624,32.551 11.644,32.571 ; 14.18,25.591 14.18,26.914 ; 14.18,33.251 14.18,34.574 ; 14.2,25.591 14.2,26.751 ; 14.2,33.251 14.2,34.411 ; 14.5,25.591 14.5,26.751 ; 14.5,33.251 14.5,34.411 ; 16.3,15.041 16.3,19.841 ; 16.6,15.041 16.6,19.841 ; 4.6,17.941 4.6,19.741 15.4,19.741 15.4,17.941 4.6,17.941 ; 6.85,26.121 7,26.121 7,26.221 6.85,26.221 6.85,26.121 ; 6.85,33.781 7,33.781 7,33.881 6.85,33.881 6.85,33.781 ; 7.1,25.871 12.9,25.871 12.9,26.021 7.1,26.021 7.1,25.871 ; 7.1,26.321 12.9,26.321 12.9,26.471 7.1,26.471 7.1,26.321 ; 7.1,33.531 12.9,33.531 12.9,33.681 7.1,33.681 7.1,33.531 ; 7.1,33.981 12.9,33.981 12.9,34.131 7.1,34.131 7.1,33.981 ; 13,26.121 13,26.221 13.15,26.221 13.15,26.121 13,26.121 ; 13,33.781 13.15,33.781 13.15,33.881 13,33.881 13,33.781
  lines w0.125: 5.773,40.291 2.776,40.291 ; 5.773,46.31 2.776,46.31 ; 5.776,40.291 5.776,46.31 ; 2.776,40.291 2.776,46.31 ; 2.776,40.291 2.776,46.31
  text "DA131 S" at 1.397,-2.087 h0.7
  text "REV1.1" at 1.847,-3.82 h0.7
Bottom Overlay:
  text "XY131B 65W 2C1A" at 26.662,-5.332 h0.7
  text "V1.0 20260721" at 26.711,-7.032 h0.7
Mechanical 1:
  lines w0.1: -3.303,18.22 -3.303,31.517 0,31.517 0,43.35 ; -3.295,18.214 0,18.214 0,0.004 ; 0.001,43.352 24.801,43.352 24.801,5.001 23.003,5.001 23.003,0.007 22.995,0 0.004,0

## Text inside footprints (layer, text, board x,y; h text height)
EC2: Top Overlay "+" at 23.712,8.844 h0.7 r90